# Altium PCB Counts_PCB.PcbDoc (part 1 of 2)
Units mil, origin at the board's own origin, x right, y up, seen from the top; angles counter-clockwise.
Board outline 3474.97 x 2159.98 mil, 2 copper layers (Top Layer, Bottom Layer); 162 components, 85 nets, 521 pads, 0 vias.
Unrouted connection lines stored in the file: 338.
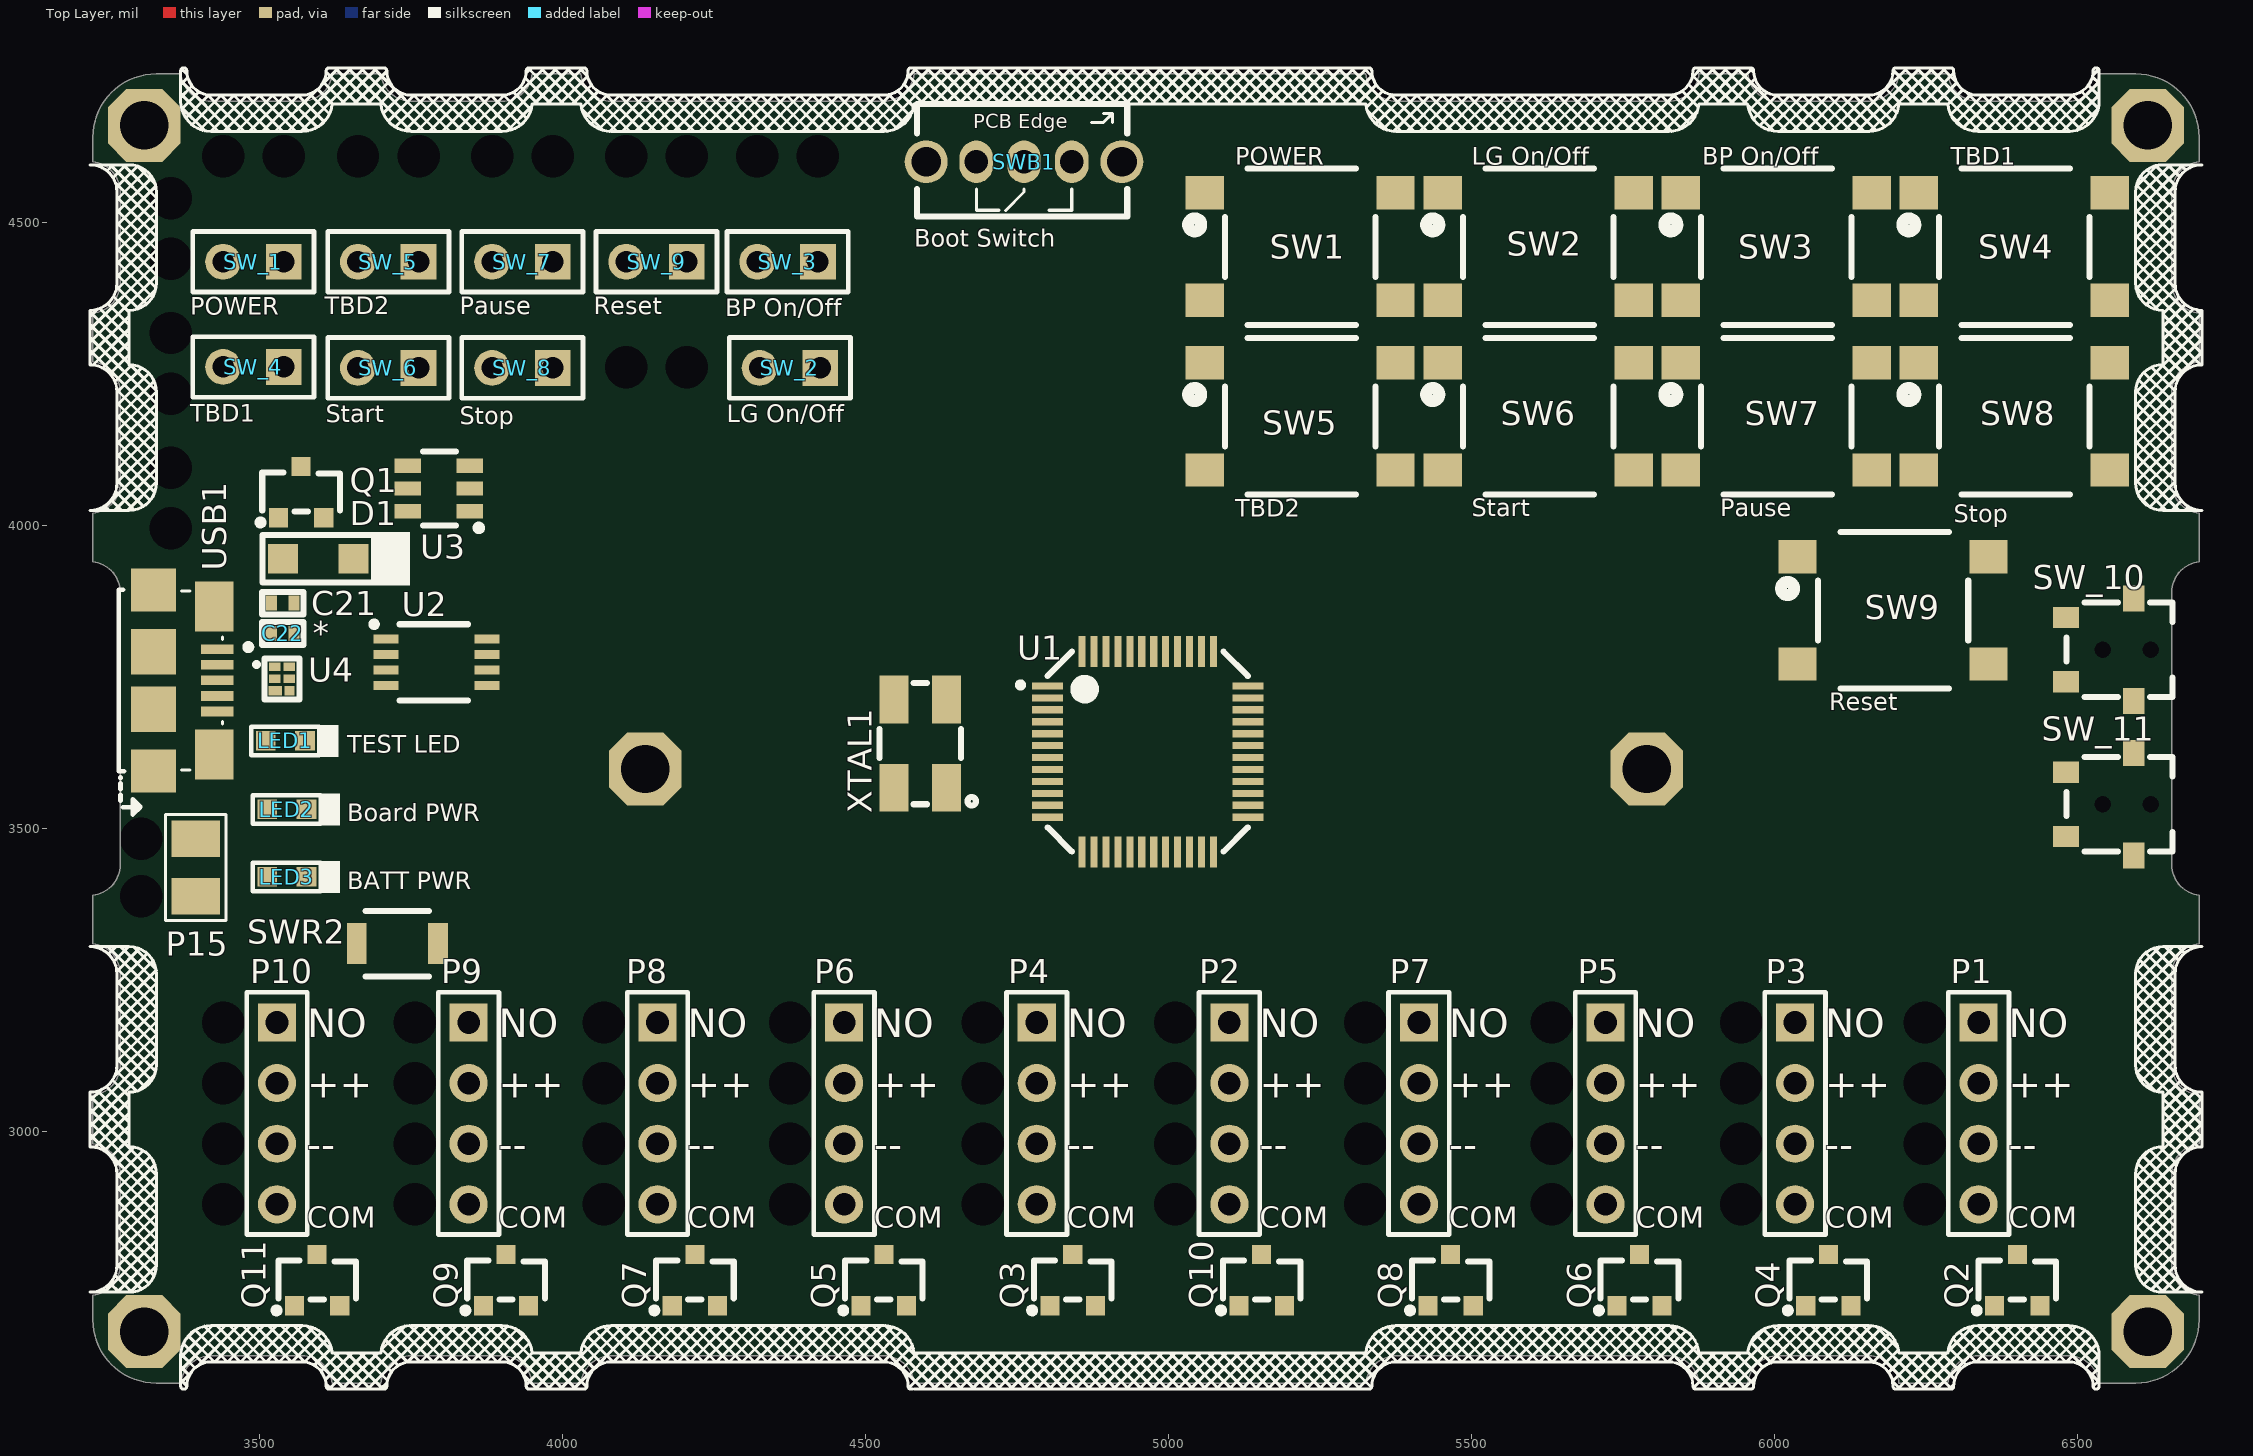
[diagram p0: Top Layer view]
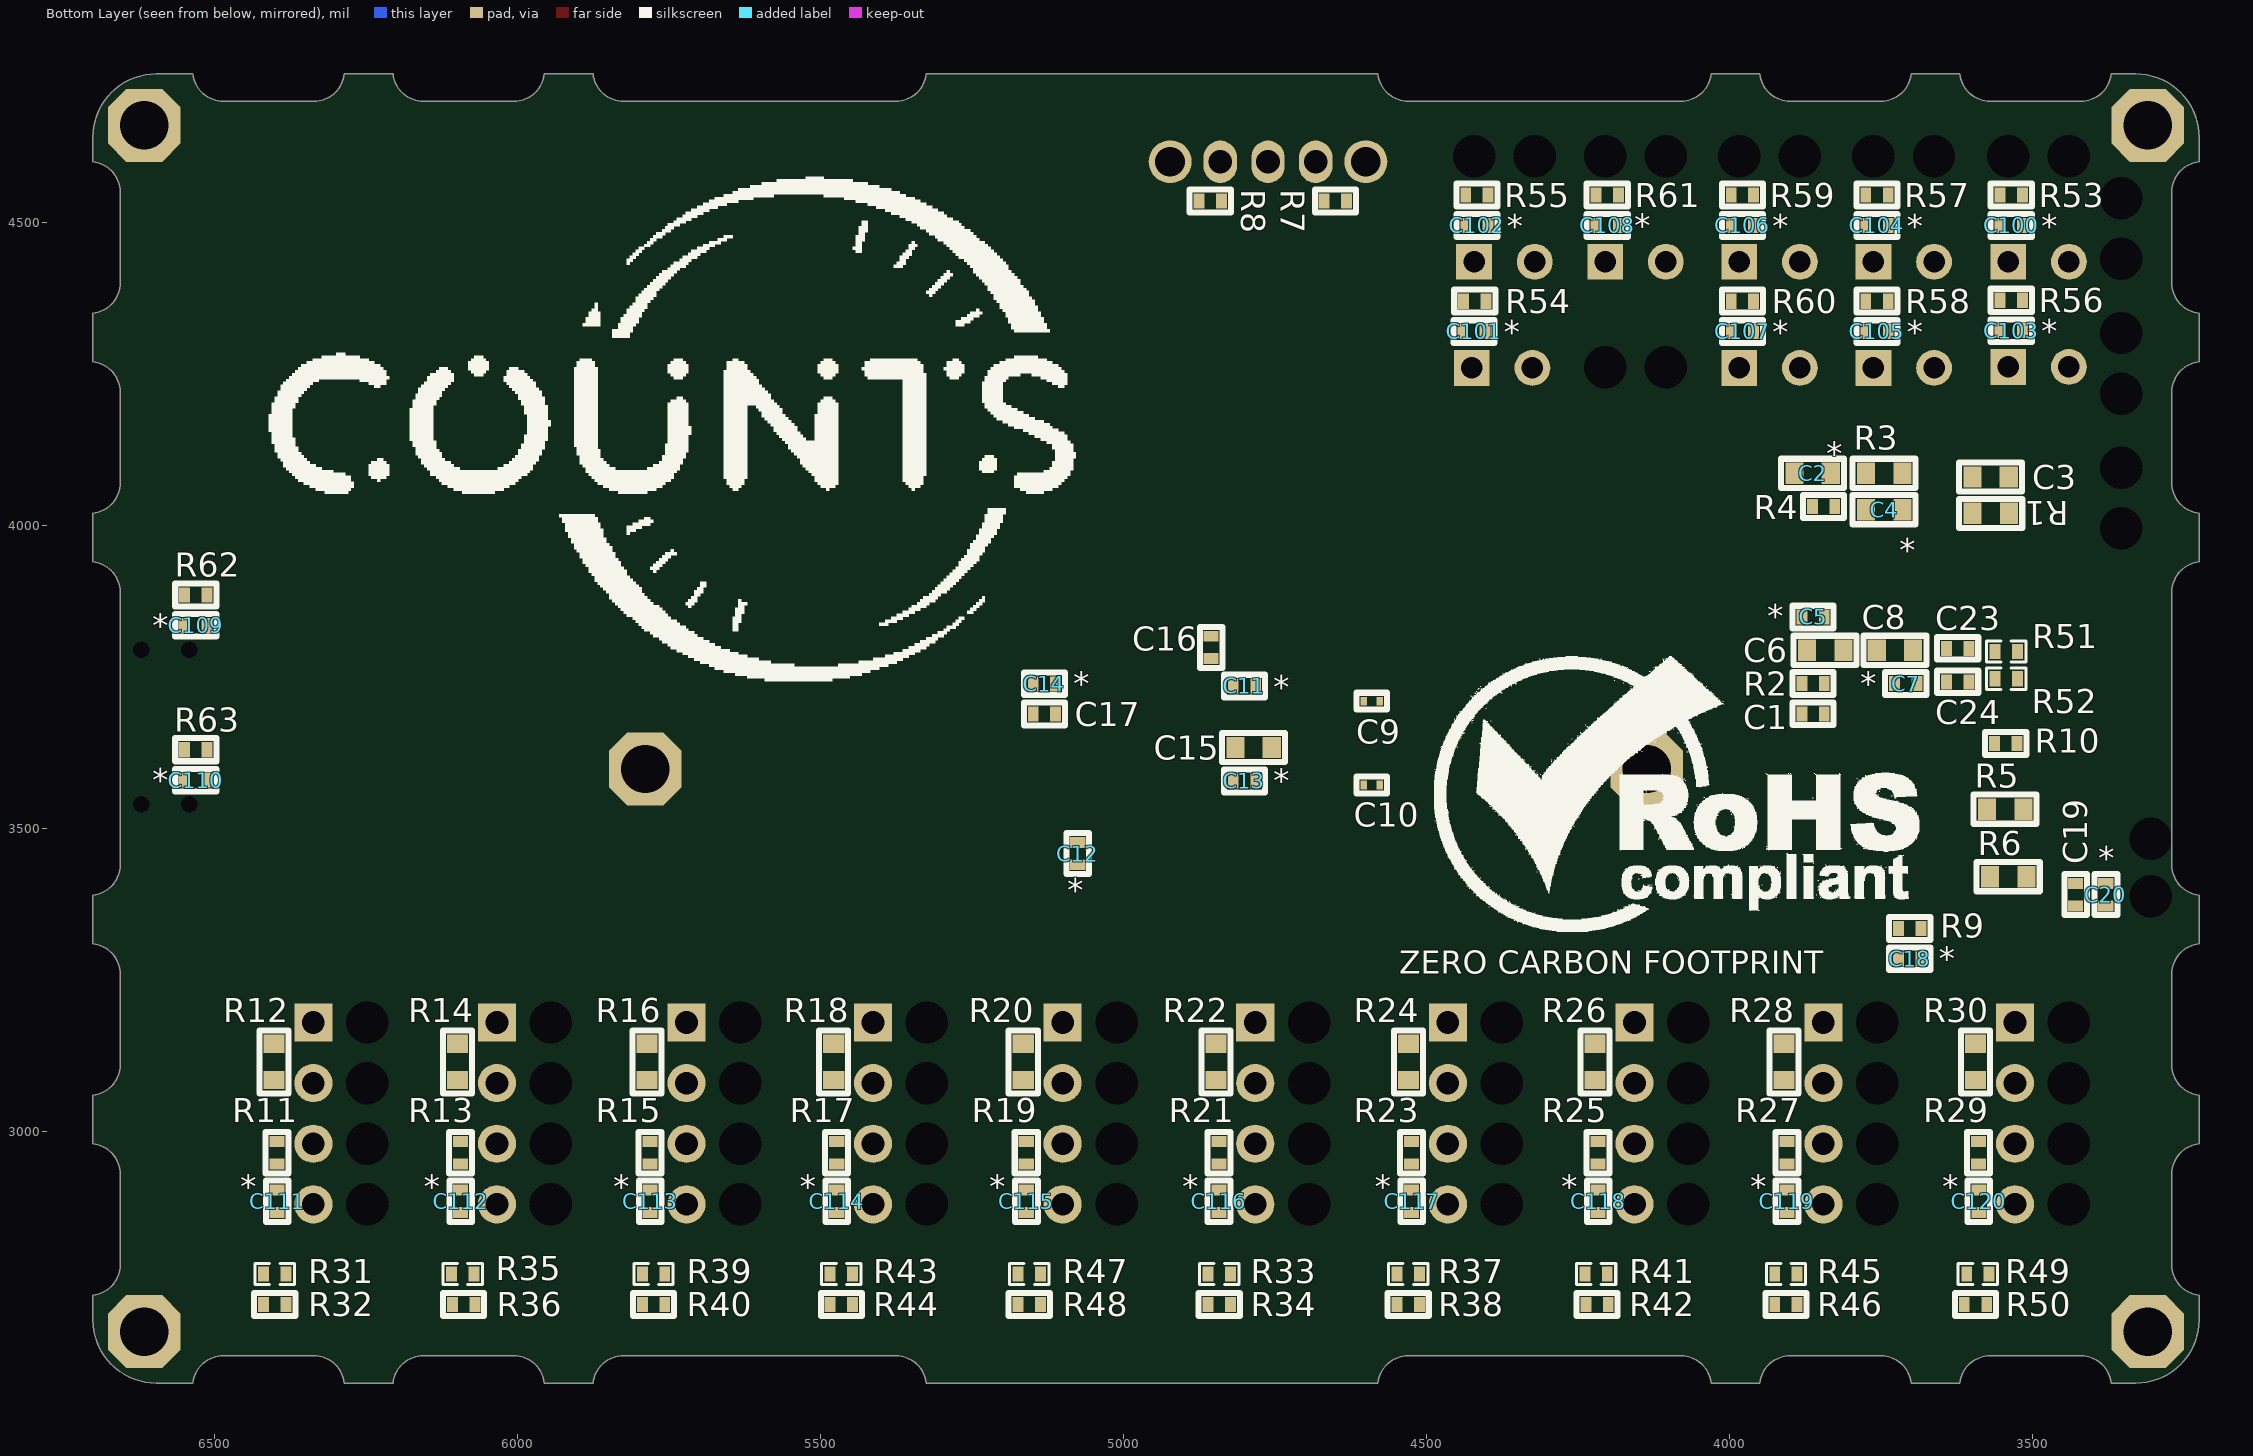
[diagram p1: Bottom Layer view, seen from below]

## Layer stack, top to bottom
Top Solder: solder mask 0.4, Solder Resist, Dk 3.5
Top Layer: signal copper 1.4
Dielectric 1: dielectric 12.6, FR-4, Dk 4.8
Bottom Layer: signal copper 1.4
Bottom Solder: solder mask 0.4, Solder Resist, Dk 3.5

## Board outline
3225.01,2689.69 cw(c3329.72,2689.72) 3225.01,2689.72 3225.01,2730.24 ccw(c3220,2780) 3270.01,2780 3270.01,2930 ccw(c3220,2930) 3225.01,2979.76 3225.01,3060.24 ccw(c3220,3110) 3270.02,3110 3270.02,3260 ccw(c3220,3260) 3225.02,3309.76 3225.02,3390.24 ccw(c3220,3440) 3270.02,3440 ccw(c3265,3440) 3270.02,3440.07 3270.02,3890 cw(c3265,3890) 3270.02,3889.91 3270.02,3890 ccw(c3220,3890) 3225.02,3939.76 3225.02,4020.24 ccw(c3220,4070) 3270.02,4070 3270.02,4220 ccw(c3220,4220) 3225.01,4269.76 3225.01,4350.24 ccw(c3220,4400) 3270.01,4400 3270.01,4550 ccw(c3220,4550) 3225.01,4599.76 3225.01,4640.28 cw(c3329.72,4640.28) 3225.01,4640.31 cw(c3329.72,4640.28) 3329.72,4744.99 ccw(c3329.72,4750) 3329.83,4744.99 3370.24,4744.99 ccw(c3420,4750) 3420,4699.99 3570,4699.99 ccw(c3570,4750) 3619.76,4744.99 3700.24,4744.99 ccw(c3750,4750) 3750,4699.99 3900,4699.99 ccw(c3900,4750) 3949.76,4744.99 4030.24,4744.99 ccw(c4080,4750) 4080,4699.99 ccw(c4080,4705) 4080.09,4699.99 4530,4699.99 ccw(c4530,4750) 4579.76,4744.99 ccw(c4580,4750) 4580,4744.99 4920,4744.99 ccw(c4920,4750) 4920.06,4744.99 5325.24,4744.99 ccw(c5375,4750) 5375,4699.99 ccw(c5375,4705) 5375.07,4699.99 5825,4699.99 ccw(c5825,4750) 5874.76,4744.99 5955.24,4744.99 ccw(c6005,4750) 6005,4699.99 6155,4699.99 ccw(c6155,4750) 6204.76,4744.99 6285.24,4744.99 ccw(c6335,4750) 6335,4699.99 6485,4699.99 ccw(c6485,4750) 6534.76,4744.99 6575.28,4744.99 ccw(c6575.28,4750) 6575.31,4744.99 6595.25,4744.99 ccw(c6595.28,4750) 6595.37,4744.99 ccw(c6595.28,4640.28) 6595.37,4744.99 ccw(c6595.28,4640.28) 6595.28,4744.99 6595.37,4744.99 cw(c6595.28,4640.28) 6699.99,4640.35 ccw(c6705,4640.28) 6699.99,4640.25 6699.99,4640.28 ccw(c6595.28,4640.28) 6699.99,4640.35 ccw(c6595.28,4640.28) 6699.99,4640.35 6699.99,4640.28 6699.99,4599.76 ccw(c6705,4550) 6654.99,4550 6654.99,4400 ccw(c6705,4400) 6699.99,4350.24 6699.99,4269.76 ccw(c6705,4220) 6654.99,4220 6654.99,4070 ccw(c6705,4070) 6699.99,4020.24 6699.99,3939.76 ccw(c6705,3890) 6654.98,3890 ccw(c6660,3890) 6654.99,3889.91 6654.99,3440 6654.98,3440 ccw(c6705,3440) 6699.98,3390.24 6699.98,3309.76 ccw(c6705,3260) 6654.99,3260 6654.99,3110 ccw(c6705,3110) 6699.99,3060.24 6699.99,2979.76 ccw(c6705,2930) 6654.99,2930 6654.99,2780 cw(c6660,2780) 6654.99,2780.08 6654.99,2780 ccw(c6705,2780) 6699.99,2730.24 6699.99,2689.72 cw(c6595.28,2689.72) 6699.99,2689.65 cw(c6595.28,2689.72) 6699.99,2689.65 cw(c6705,2689.72) 6699.99,2689.75 6699.99,2689.65 cw(c6595.28,2689.72) 6595.71,2585.01 6534.76,2585.01 ccw(c6485,2580) 6485,2630.01 6335,2630.01 ccw(c6335,2580) 6285.24,2585.01 6204.76,2585.01 ccw(c6155,2580) 6155,2630.01 6005,2630.01 ccw(c6005,2580) 5955.24,2585.01 5874.76,2585.01 ccw(c5825,2580) 5825,2630.01 ccw(c5825,2625) 5824.91,2630.01 5375,2630.01 cw(c5375,2625) 5375.07,2630.01 5375,2630.01 ccw(c5375,2580) 5325.24,2585.01 4920,2585.01 cw(c4920,2580) 4920.06,2585.01 4920,2585.01 4580,2585.01 ccw(c4580,2580) 4579.76,2585.01 ccw(c4530,2580) 4530,2630.01 ccw(c4530,2625) 4529.93,2630.01 4080,2630.01 cw(c4080,2625) 4080.09,2630.01 4080,2630.01 ccw(c4080,2580) 4030.24,2585.01 3949.76,2585.01 ccw(c3900,2580) 3900,2630.01 3750,2630.01 ccw(c3750,2580) 3700.24,2585.01 3619.76,2585.01 ccw(c3570,2580) 3570,2630.01 3420,2630.01 ccw(c3420,2580) 3370.24,2585.01 3329.72,2585.01 cw(c3329.72,2689.72)

## Design rules (kind name [scope] priority, off if disabled: settings)
Clearance [All] p1: gap=4 ignorepadtopadclearanceinfootprint=FALSE
MinimumSolderMaskSliver [All] p1: minsoldermaskwidth=0
PolygonConnect [All] p1: connectstyle=Relief reliefconductorwidth=10 reliefentries=4 polygonreliefangle="90 Angle" airgapwidth=10
RoutingVias [All] p1: holewidth=28 width=50 viastyle="Through Hole" minholewidth=28 minwidth=50 maxholewidth=28 maxwidth=50
SilkToSilkClearance [All] p1: silktosilkclearance=0
SilkToSolderMaskClearance [IsPad] p1: minsilkscreentomaskgap=0 clearancetoexposedcopper=TRUE
SolderMaskExpansion [All] p1: expansion=4
Width [All] p1: maxlimit=10 minlimit=10 preferedwidth=10
27 further rules are at their usual default settings.

## Classes and differential pairs
component class U_Power_Section: C1 C2 C3 C4 C5 C6 C7 C8 D1 LED2 LED3 Q1 R1 R2 R3 R4 R5 R6 U2 U3
component class U_Controller_Section: C9 C10 C11 C12 C13 C14 C15 C16 C17 C18 LED1 R7 R8 R9 R10 SWB1 SWR2 U1 XTAL1
component class U_Connector_Section: C19 C20 C21 C22 C23 C24 P15 R51 R52 U4 USB1
component class U_Buttons_Section: C111 C112 C113 C114 C115 C116 C117 C118 C119 C120 P1 P2 P3 P4 P5 P6 P7 P8 P9 P10 Q2 Q3 Q4 Q5 Q6 Q7 Q8 Q9 Q10 Q11 R11 R12 R13 R14 R15 R16 R17 R18 R19 R20 R21 R22 R23 R24 R25 R26 R27 R28 R29 R30 R31 R32 R33 R34 R35 R36 R37 R38 R39 R40 R41 R42 R43 R44 R45 R46 R47 R48 R49 R50
component class U_Buttons_Section_2: C100 C101 C102 C103 C104 C105 C106 C107 C108 C109 C110 R53 R54 R55 R56 R57 R58 R59 R60 R61 R62 R63 SW3 SW4 SW5 SW6 SW7 SW8 SW9 SW_1 SW_2 SW_3 SW_4 SW_5 SW_6 SW_7 SW_8 SW_9 SW_10 SW_11 SWB1 SWR2

## Components (designator, comment, footprint, x,y, rotation, side; value= is the part's Value field where it differs from the comment)
C1 "10nF" Cap0402 3862,3689 r0 bottom
C2 "0.1uF" Cap0603 3862.66,4086 r0 bottom
C3 "1uF" Cap0603 3569.06,4080 r180 bottom
C4 "0.1uF" Cap0603 3744.66,4026 r180 bottom
C5 "0.1uF" Cap0402 3862,3849 r180 bottom
C6 "1uF" Cap0603 3842,3794 r0 bottom
C7 "0.1uF" Cap0402 3709,3739 r0 bottom
C8 "1uF" Cap0603 3727,3794 r180 bottom
C9 "20pF" "Cap 0201" 4590,3710 r0 bottom
C10 "20pF" "Cap 0201" 4590,3572 r180 bottom
C11 "0.1uF" Cap0402 4800,3735.2 r180 bottom
C12 "0.1uF" Cap0402 5075,3458.66 r270 bottom
C13 "0.1uF" Cap0402 4800,3578.66 r180 bottom
C14 "0.1uF" Cap0402 5130,3738.66 r0 bottom
C15 "4.7uF" Cap0603 4785,3633.66 r0 bottom
C16 "1uF" Cap0402 4855,3798.66 r90 bottom
C17 "10nF" Cap0402 5130,3688.66 r0 bottom
C18 "0.1uF" Cap0402 3702.5,3285 r0 bottom
C19 "10uF" Cap0402 3429,3391 r90 bottom
C20 "0.1uF" Cap0402 3379,3391 r90 bottom
C21 "10uF" Cap0402 3538.5,3872.01 r0 top
C22 "0.1uF" Cap0402 3538.5,3822.01 r0 top
C23 "47pF" Cap0402 3623.5,3797.01 r0 bottom
C24 "47pF" Cap0402 3623.5,3742.01 r0 bottom
C100 "0.1uF" Cap0402 3535,4495 r180 bottom
C101 "0.1uF" Cap0402 4421.5,4320 r180 bottom
C102 "0.1uF" Cap0402 4416.5,4495 r180 bottom
C103 "0.1uF" Cap0402 3535,4321.5 r180 bottom
C104 "0.1uF" Cap0402 3756.5,4495 r180 bottom
C105 "0.1uF" Cap0402 3756.5,4320 r180 bottom
C106 "0.1uF" Cap0402 3978.5,4495 r180 bottom
C107 "0.1uF" Cap0402 3978.5,4320 r180 bottom
C108 "0.1uF" Cap0402 4201.5,4495 r180 bottom
C109 "0.1uF" Cap0402 6530,3835 r0 bottom
C110 "0.1uF" Cap0402 6530,3580 r180 bottom
C111 "0.1uF" Cap0402 6396.11,2885 r90 bottom
C112 "0.1uF" Cap0402 6093.33,2885 r90 bottom
C113 "0.1uF" Cap0402 5780.56,2885 r90 bottom
C114 "0.1uF" Cap0402 5472.78,2885 r90 bottom
C115 "0.1uF" Cap0402 5160,2885 r90 bottom
C116 "0.1uF" Cap0402 4842.22,2885 r90 bottom
C117 "0.1uF" Cap0402 4524.44,2885 r90 bottom
C118 "0.1uF" Cap0402 4216.67,2885 r90 bottom
C119 "0.1uF" Cap0402 3905,2885 r90 bottom
C120 "0.1uF" Cap0402 3588.39,2885 r270 bottom
D1 "MBR120VLSFT3G" MBR120VLSFT3G 3596.96,3945 r0 top
LED1 "LTST-C191KGKT" "LED 0603" 3542.52,3645 r0 top
LED2 "Blue" "LED 0603" 3545,3531.85 r0 top
LED3 "Blue" "LED 0603" 3545,3420.5 r0 top
P1 "61300411121" HDR1X4 6336.11,3030 r0 top
P2 "61300411121" HDR1X4 5100,3030 r0 top
P3 "61300411121" HDR1X4 6033.33,3030 r0 top
P4 "61300411121" HDR1X4 4782.22,3030 r0 top
P5 "61300411121" HDR1X4 5720.56,3030 r0 top
P6 "61300411121" HDR1X4 4464.44,3030 r0 top
P7 "61300411121" HDR1X4 5412.78,3030 r0 top
P8 "61300411121" HDR1X4 4156.67,3030 r0 top
P9 "61300411121" HDR1X4 3845,3030 r0 top
P10 "61300411121" HDR1X4 3528.89,3030 r0 top
P15 "SMD PAD" "Solder Bridge" 3394.79,3438.01 r90 top
Q1 "DMP2045U-7" SOT23-3 3568.53,4055 r0 top locked
Q2 "MMBT918LT1G" SOT23-3 6400.01,2755 r0 top locked
Q3 "MMBT918LT1G" SOT23-3 4841.67,2755 r0 top locked
Q4 "MMBT918LT1G" SOT23-3 6088.34,2755 r0 top locked
Q5 "MMBT918LT1G" SOT23-3 4530,2755 r0 top locked
Q6 "MMBT918LT1G" SOT23-3 5776.67,2755 r0 top locked
Q7 "MMBT918LT1G" SOT23-3 4218.33,2755 r0 top locked
Q8 "MMBT918LT1G" SOT23-3 5465,2755 r0 top locked
Q9 "MMBT918LT1G" SOT23-3 3906.67,2755 r0 top locked
Q10 "MMBT918LT1G" SOT23-3 5153.34,2755 r0 top locked
Q11 "MMBT918LT1G" SOT23-3 3595,2755 r0 top locked
R1 "100K" Res0603 3568.89,4020 r0 bottom
R2 "10K" Res0402 3862,3739 r180 bottom
R3 "665R" Res0603 3744.66,4086 r0 bottom
R4 "10K" Res0402 3844.66,4031 r0 bottom
R5 "330R" Res0603 3545,3531.85 r180 bottom
R6 "330R" Res0603 3540,3420.5 r180 bottom
R7 "20K" Res0402 4650,4535 r180 bottom
R8 "20K" Res0402 4856.5,4535 r0 bottom
R9 "20K" Res0402 3702.5,3335 r180 bottom
R10 "1K" Res0402 3544.01,3640 r0 bottom
R11 "10K" Res0402 6396.11,2965 r90 bottom
R12 "330R" Res0603 6401.11,3115 r90 bottom
R13 "10K" Res0402 6093.33,2965 r90 bottom
R14 "330R" Res0603 6098.33,3115 r90 bottom
R15 "10K" Res0402 5780.56,2965 r90 bottom
R16 "330R" Res0603 5785.56,3115 r90 bottom
R17 "10K" Res0402 5472.78,2965 r90 bottom
R18 "330R" Res0603 5477.78,3115 r90 bottom
R19 "10K" Res0402 5160,2965 r90 bottom
R20 "330R" Res0603 5165,3115 r270 bottom
R21 "10K" Res0402 4842.22,2965 r90 bottom
R22 "330R" Res0603 4847.22,3115 r90 bottom
R23 "10K" Res0402 4524.44,2965 r90 bottom
R24 "330R" Res0603 4529.44,3115 r90 bottom
R25 "10K" Res0402 4216.67,2965 r90 bottom
R26 "330R" Res0603 4221.67,3115 r90 bottom
R27 "10K" Res0402 3905,2965 r90 bottom
R28 "330R" Res0603 3910,3115 r270 bottom
R29 "10K" Res0402 3588.89,2965 r90 bottom
R30 "330R" Res0603 3593.89,3115 r90 bottom
R31 "4.7K" Res0402 6400,2765 r180 bottom
R32 "47K" Res0402 6400,2715 r180 bottom
R33 "4.7K" Res0402 4841.66,2765 r180 bottom
R34 "47K" Res0402 4841.66,2715 r180 bottom
R35 "4.7K" Res0402 6090,2765 r180 bottom
R36 "47K" Res0402 6088.33,2715 r180 bottom
R37 "4.7K" Res0402 4530,2765 r180 bottom
R38 "47K" Res0402 4530,2715 r180 bottom
R39 "4.7K" Res0402 5775,2765 r180 bottom
R40 "47K" Res0402 5775,2715 r180 bottom
R41 "4.7K" Res0402 4220,2765 r180 bottom
R42 "47K" Res0402 4218.33,2715 r180 bottom
R43 "4.7K" Res0402 5465,2765 r180 bottom
R44 "47K" Res0402 5465,2715 r180 bottom
R45 "4.7K" Res0402 3906.66,2765 r180 bottom
R46 "47K" Res0402 3906.66,2715 r180 bottom
R47 "4.7K" Res0402 5155,2765 r180 bottom
R48 "47K" Res0402 5155,2715 r180 bottom
R49 "4.7K" Res0402 3590,2765 r180 bottom
R50 "47K" Res0402 3594,2715 r180 bottom
R51 "27R" Res0402 3543.5,3792.01 r180 bottom
R52 "27R" Res0402 3543.5,3747.01 r180 bottom
R53 "10K" Res0402 3535,4545 r180 bottom
R54 "10K" Res0402 4420,4370 r180 bottom
R55 "10K" Res0402 4416.5,4545 r180 bottom
R56 "10K" Res0402 3535,4371.5 r180 bottom
R57 "10K" Res0402 3756.5,4545 r180 bottom
R58 "10K" Res0402 3756.5,4370 r180 bottom
R59 "10K" Res0402 3978.5,4545 r180 bottom
R60 "10K" Res0402 3978.5,4370 r180 bottom
R61 "10K" Res0402 4201.5,4545 r180 bottom
R62 "10K" Res0402 6530,3885 r0 bottom
R63 "10K" Res0402 6530,3630 r180 bottom
SW1 "B3FS-1012P" B3FS-1012P 5216.85,4460 r180 top
SW2 "B3FS-1012P" B3FS-1012P 5609.57,4460 r180 top
SW3 "B3FS-1012P" B3FS-1012P 6002.28,4460 r180 top
SW4 "B3FS-1012P" B3FS-1012P 6395,4460 r180 top
SW5 "B3FS-1012P" B3FS-1012P 5216.85,4180 r180 top
SW6 "B3FS-1012P" B3FS-1012P 5609.57,4180 r180 top
SW7 "B3FS-1012P" B3FS-1012P 6002.28,4180 r180 top
SW8 "B3FS-1012P" B3FS-1012P 6395,4180 r180 top
SW9 "B3FS-1012P" B3FS-1012P 6195,3860 r180 top
SW_1 "61300211121" HDR1X2 3539.94,4435 r180 top
SW_2 "61300211121" HDR1X2 4424.94,4260 r180 top
SW_3 "61300211121" HDR1X2 4421.19,4435 r180 top
SW_4 "61300211121" HDR1X2 3539.94,4261.5 r180 top
SW_5 "61300211121" HDR1X2 3762.44,4435 r180 top
SW_6 "61300211121" HDR1X2 3762.44,4260 r180 top
SW_7 "61300211121" HDR1X2 3983.69,4435 r180 top
SW_8 "61300211121" HDR1X2 3983.69,4260 r180 top
SW_9 "61300211121" HDR1X2 4204.94,4435 r180 top
SW_10 "ESE-18R61D" ESE-18R61D 6550.12,3795 r270 top locked
SW_11 "ESE-18R61D" ESE-18R61D 6550.12,3540 r270 top locked
SWB1 "OS102011MA1QN1" OS102011MA1QN1 4682.52,4600 r0 top
SWR2 "B3U-1000P" B3U-1000P 3727.5,3310 r0 top
U1 "STM32F070CBT6TR" STM32F070CBT6TR 4965.35,3626.93 r0 top locked
U2 "NCP3335ADM330R2G" NCP3335ADM330R2G 3792,3774 r0 top locked
U3 "BQ21040DBVR" BQ21040DBVR 3795.84,4061 r180 top locked
U4 "SP3014-02UTG" SP3014-02UTG 3525,3766.69 r0 top
USB1 "10118192-0001LF" "Micro Usb Conn SMD" 3377.66,3744.25 r90 top locked
XTAL1 "8MHZ" 7B08070001 4590,3640 r90 top locked

## Footprints (in the part's own frame and the unit in brackets; to place one, negate y for a bottom-side part, rotate by r counter-clockwise, add the part's x,y. Pads: shape width x height; smd on the part's side, far side on the other; paste and mask are expansions set on the pad)
7B08070001 [mm]
  rect 2x1.2 smd: 1(-1.85,-1.1) 2(1.85,-1.1) 3(1.85,1.1) 4(-1.85,1.1)
  silkscreen extent -2.59,-2.34 2.54,1.7, body extent -2.47,-1.6 2.53,1.6, height 0.91
B3FS-1012P [mm]
  rect 1.6x1.4 smd: 1(4,-2.25) 2(-4,-2.25) 3(4,2.25) 4(-4,2.25)
  silkscreen extent -3.15,-3.28 4.69,3.28, body extent -4,-3.15 4,3.15, height 3.1
B3U-1000P [mm] "SWITCH TACTILE SPST-NO 0.05A 12V"
  rect 0.82x1.72 smd: 1(-1.7,0) 2(1.7,0)
  silkscreen extent -1.35,-1.37 1.32,1.37, body extent -2,-1.26 2,1.24, height 1.6
BQ21040DBVR [mm]
  rect 1.1x0.6 smd: 1(-1.3,0.95) 2(-1.3,0) 3(-1.3,-0.95) 4(1.3,-0.95) 5(1.3,0) 6(1.3,0.95)
  silkscreen extent -1.81,-1.55 0.66,1.79, body extent -1.4,-1.45 1.4,1.45, height 1.37
Cap0402 [mil]
  rect 18x25 smd: 1(-18.5,0) 2(18.5,0)
  silkscreen extent -34,-19 34,18, body extent -20,-10 20,10, height 19
Cap0603 [mil]
  rect 30x35 smd: 1(30,0) 2(-30,0)
  silkscreen extent -52,-24 52,24, body extent -31,-16 32,16, height 34
"Cap 0201" [mm]
  rect 0.27x0.37 smd: 1(-0.33,0) 2(0.33,0)
  silkscreen extent -0.64,-0.36 0.64,0.36, body extent -0.3,-0.16 0.3,0.17, height 0.21
ESE-18R61D [mm]
  rect 1.1x0.9 smd: 1(-2.15,1.075) 2(2.15,1.075)
  round 0 hole 0.7 unplated: MH1(0,1.775) MH1(0,-0.235)
  rect 0.9x1.1 smd: MP1(-1.35,-1.775) MP2(1.35,-1.775)
  silkscreen extent -1.98,-1.75 1.98,2.69, body extent -2.49,-2.13 2.51,4.68, height 1.23
HDR1X2 [mm] "CONN HEADER VERT 2POS 2.54MM"
  rect 1.5x1.5 hole 0.9: 1(0,0)
  round 1.5 hole 0.9: 2(2.54,0)
  silkscreen extent -1.27,-1.27 3.81,1.27, body extent -1.27,-1.27 3.81,1.27, height 8.44
HDR1X4 [mm] "Connector; Header; 4 Position"
  rect 1.6x1.6 hole 0.95: 1(0,3.81)
  round 1.6 hole 0.95: 2(0,1.27) 3(0,-1.27) 4(0,-3.81)
  silkscreen extent -1.27,-5.08 1.27,5.08, body extent -1.27,-5.08 1.27,5.08, height 9.5
"LED 0603" [mm]
  rect 0.82x0.82 smd: 1(-0.825,0) 2(0.825,0)
  silkscreen extent -1.42,-0.69 2.24,0.66, body extent -0.8,-0.4 0.8,0.4, height 0.38
MBR120VLSFT3G [mm] "DIODE SCHOTTKY 20V 1A SOD123FL"
  rect 1.25x1.22 smd: 1(-1.475,0) 2(1.475,0)
  silkscreen extent -2.33,-1.12 3.84,1.12, body extent -1.87,-0.85 1.88,0.85, height 1.2
"Micro Usb Conn SMD" [mm] "CONN RCPT USB2.0 MICRO B SMD R/A"
  rect 0.4x1.35 smd: 1(1.3,-1.338) 2(0.65,-1.338) 3(0,-1.338) 4(-0.65,-1.338) 5(-1.3,-1.338)
  rect 2.1x1.6 smd: MP1(3.1,-1.212) MP2(-3.1,-1.212)
  rect 1.8x1.9 smd: MP3(-3.8,1.338) MP6(3.8,1.338)
  rect 1.9x1.9 smd: MP4(-1.2,1.338) MP5(1.2,1.338)
  silkscreen extent -5.61,-2.74 3.8,2.79, body extent -3.95,-1.57 3.96,4.09, height 2.74
NCP3335ADM330R2G [mm]
  rect 1.04x0.38 smd: 1(-2.12,0.975) 2(-2.12,0.325) 3(-2.12,-0.325) 4(-2.12,-0.975) 5(2.12,-0.975) 6(2.12,-0.325) 7(2.12,0.325) 8(2.12,0.975)
  silkscreen extent -2.73,-1.6 1.32,1.71, body extent -2.46,-1.53 2.46,1.52, height 1.01
OS102011MA1QN1 [mm] "2 Position SPDT Miniature Slide Switch 100MA 12V Through Hole, Right Angle"
  oval 1.4x1.778 hole 1: 1(0,0) 2(2,0) 3(4,0)
  round 1.8 hole 1.25: MH1(-2.1,0) MH2(6.1,0)
  silkscreen extent -2.49,-2.29 6.32,2.41, body extent -2.4,-2.29 6.21,6.09, height 4.71
Res0402 [mil]
  rect 18x25 smd: 1(-18.5,0) 2(18.5,0)
  silkscreen extent -34,-19 34,19, body extent -23,-11 23,11, height 16
Res0603 [mil]
  rect 30x35 smd: 1(30,0) 2(-30,0)
  silkscreen extent -52,-24 52,24, body extent -31,-17 31,17, height 18
"Solder Bridge" [mil] "Solder Bridge ON"
  rect 60x80 smd: 1(-50,0) 2(45,0)
  silkscreen extent -90,-50 85,50
SOT23-3 [mm] "SOT23, 3-Leads, Body 2.9x1.3mm, Pitch 0.95mm, Lead Span 2.3mm - Reverse Pinning, IPC High Density"
  rect 0.8x0.8 smd: 1(-0.95,-1.075) 2(0.95,-1.075) 3(0,1.075)
  silkscreen extent -1.83,-1.39 1.63,0.81, body extent -1.5,-1.25 1.5,1.25, height 1.05
SP3014-02UTG [mm]
  rect 0.48x0.35 smd: 1(0,0) 2(0,-0.5) 5(0.62,-0.5) 6(0.62,0)
  rect 0.55x0.4 smd: 3(0.025,-1)
  rect 0.42x0.4 smd: 4(0.62,-1)
  silkscreen extent -0.82,-1.37 1.04,0.36
STM32F070CBT6TR [mm]
  rect 1.3x0.3 smd: 1(-4.2,2.75) 2(-4.2,2.25) 3(-4.2,1.75) 4(-4.2,1.25) 5(-4.2,0.75) 6(-4.2,0.25) 7(-4.2,-0.25) 8(-4.2,-0.75) 9(-4.2,-1.25) 10(-4.2,-1.75) 11(-4.2,-2.25) 12(-4.2,-2.75) 25(4.2,-2.75) 26(4.2,-2.25) 27(4.2,-1.75) 28(4.2,-1.25) 29(4.2,-0.75) 30(4.2,-0.25) 31(4.2,0.25) 32(4.2,0.75) 33(4.2,1.25) 34(4.2,1.75) 35(4.2,2.25) 36(4.2,2.75)
  rect 0.3x1.3 smd: 13(-2.75,-4.2) 14(-2.25,-4.2) 15(-1.75,-4.2) 16(-1.25,-4.2) 17(-0.75,-4.2) 18(-0.25,-4.2) 19(0.25,-4.2) 20(0.75,-4.2) 21(1.25,-4.2) 22(1.75,-4.2) 23(2.25,-4.2) 24(2.75,-4.2) 37(2.75,4.2) 38(2.25,4.2) 39(1.75,4.2) 40(1.25,4.2) 41(0.75,4.2) 42(0.25,4.2) 43(-0.25,4.2) 44(-0.75,4.2) 45(-1.25,4.2) 46(-1.75,4.2) 47(-2.25,4.2) 48(-2.75,4.2)
  silkscreen extent -5.44,-4.19 4.19,4.19, body extent -4.5,-4.5 4.5,4.5, height 1.39

## Part data
C1 C17: library part CC0402KRX7R8BB103, "CAP CER 10000PF 25V X7R 0402", Case/Package=0402, Case Code (Metric)=1005, Dielectric=X7R, Manufacturer=Yageo, Max Operating Temperature=125°C, Min Operating Temperature=-55°C, Package Quantity=1, Supplier Part Number 1=311-1337-1-ND, Tolerance=10%, Voltage Rating=25V, Capacitance=10nF, Case Code (Imperial)=0402, ComponentLink1Description=http://www.yageo.com/documents/recent/UPY-GPHC_X7R_6.3V-to-50V_18.pdf?src-supplier=Digi-Key, ComponentLink1URL=http://www.yageo.com/documents/recent/UPY-GPHC_X7R_6.3V-to-50V_18.pdf?src-supplier=Digi-Key, ComponentLink2Description=https://www.verical.com/server-webapp/html/getDatasheet?partID=375418&src-supplier=Verical, ComponentLink2URL=https://www.verical.com/server-webapp/html/getDatasheet?partID=375418&src-supplier=Verical, ComponentLink3Description=http://www.yageo.com/documents/recent/UPY-GPHC_X7R_6.3V-to-50V_8.pdf?src-supplier=Avnet, ComponentLink3URL=http://www.yageo.com/documents/recent/UPY-GPHC_X7R_6.3V-to-50V_8.pdf?src-supplier=Avnet, ComponentLink4Description=https://4donline.ihs.com/images/VipMasterIC/IC/YAGO/YAGO-S-A0003557223/YAGO-S-A0003557223-1.pdf?hkey=52A5661711E402568146F3353EA87419&src-supplier=Element14, ComponentLink4URL=https://4donline.ihs.com/images/VipMasterIC/IC/YAGO/YAGO-S-A0003557223/YAGO-S-A0003557223-1.pdf?hkey=52A5661711E402568146F3353EA87419&src-supplier=Element14, ComponentLink5Description=http://www.farnell.com/datasheets/2167236.pdf?src-supplier=Element14, ComponentLink5URL=http://www.farnell.com/datasheets/2167236.pdf?src-supplier=Element14, ComponentLink6Description=http://www.mouser.com/ds/2/447/Yageo_UPY-GP_NP0_16V-to-50V_9-358835.pdf?src-supplier=Mouser, ComponentLink6URL=http://www.mouser.com/ds/2/447/Yageo_UPY-GP_NP0_16V-to-50V_9-358835.pdf?src-supplier=Mouser, Composition=Ceramic, Depth=0.5mm, Halogen Free="Halogen Free", Height=0.5mm, Lead Free="Lead Free", Length=1mm, Manufacturer Part Number=CC0402KRX7R8BB103, Mount="Surface Mount", Packaging="Tape and Reel", Pricing 1="1=0.1, 10=0.021, 100=0.0093, 500=0.00666, 1000=0.00523, 2500=0.00476, 5000=0.00438 (USD)", Radiation Hardening=No, REACH SVHC=Unknown, Stock 1=0, Supplier 1=Digi-Key, Termination=SMD/SMT, Thickness=0.022inch, Voltage Rating (DC)=25V, Width=0.02inch
C2 C4: library part CC0603ZRY5V9BB104, "CAP CER 0.1UF 50V Y5V 0603", Capacitance=100nF, Case/Package=0603, Case Code (Metric)=1608, Dielectric=Y5V, Manufacturer=Yageo, Max Operating Temperature=85°C, Min Operating Temperature=-30°C, Package Quantity=1, Supplier Part Number 1=311-1343-1-ND, Tolerance=80%, Voltage=50V, Case Code (Imperial)=0603, ComponentLink1Description=http://www.yageo.com/documents/recent/UPY-GPHC_Y5V_6.3V-to-50V_8.pdf?src-supplier=Digi-Key, ComponentLink1URL=http://www.yageo.com/documents/recent/UPY-GPHC_Y5V_6.3V-to-50V_8.pdf?src-supplier=Digi-Key, ComponentLink2Description=http://www.yageo.com/documents/recent/UPY-GPHC_Y5V_6.3V-to-50V_5.pdf?src-supplier=Avnet+Europe, ComponentLink2URL=http://www.yageo.com/documents/recent/UPY-GPHC_Y5V_6.3V-to-50V_5.pdf?src-supplier=Avnet+Europe, ComponentLink3Description=https://www.verical.com/server-webapp/html/getDatasheet?partID=403611&src-supplier=Verical, ComponentLink3URL=https://www.verical.com/server-webapp/html/getDatasheet?partID=403611&src-supplier=Verical, ComponentLink4Description=http://www.mouser.com/ds/2/447/Yageo_UPY-GP_NP0_16V-to-50V_9-358835.pdf?src-supplier=Mouser, ComponentLink4URL=http://www.mouser.com/ds/2/447/Yageo_UPY-GP_NP0_16V-to-50V_9-358835.pdf?src-supplier=Mouser, ComponentLink5Description=http://www.farnell.com/datasheets/1132289.pdf?src-supplier=Element14, ComponentLink5URL=http://www.farnell.com/datasheets/1132289.pdf?src-supplier=Element14, Composition=Ceramic, Depth=0.8mm, Halogen Free="Halogen Free", Height=0.8mm, Lead Free="Lead Free", Length=1.6mm, Manufacturer Part Number=CC0603ZRY5V9BB104, Mount="Surface Mount", Number of Pins=2, Packaging="Tape and Reel", Pricing 1="1=0.1, 10=0.075, 100=0.0334, 500=0.02386, 1000=0.01874 (USD)", Radiation Hardening=No, REACH SVHC="No SVHC", Stock 1=15000880, Supplier 1=Digi-Key, Termination=SMD/SMT, Thickness=0.035inch, Voltage Rating=50V, Voltage Rating (DC)=50V, Width=0.031inch
C3 C6 C8: library part UMK107AB7105KA-T, "CAP CER 1UF 50V X7R 0603", Case/Package=0603, Case Code (Metric)=1608, Dielectric=X7R, Manufacturer="Taiyo Yuden", Max Operating Temperature=125°C, Min Operating Temperature=-55°C, Package Quantity=1, Supplier Part Number 1=587-3247-1-ND, Tolerance=10%, Voltage Rating=50V, Capacitance=1uF, Case Code (Imperial)=0603, ComponentLink1Description=http://www.farnell.com/datasheets/2048165.pdf?src-supplier=Element14, ComponentLink1URL=http://www.farnell.com/datasheets/2048165.pdf?src-supplier=Element14, ComponentLink2Description=https://www.murata.com/~/media/webrenewal/support/library/catalog/products/capacitor/mlcc/c02e.ashx?la=en-us&src-supplier=Digi-Key, ComponentLink2URL=https://www.murata.com/~/media/webrenewal/support/library/catalog/products/capacitor/mlcc/c02e.ashx?la=en-us&src-supplier=Digi-Key, ComponentLink3Description=https://www.yuden.co.jp/productdata/catalog/mlcc_all_e.pdf?src-supplier=Digi-Key, ComponentLink3URL=https://www.yuden.co.jp/productdata/catalog/mlcc_all_e.pdf?src-supplier=Digi-Key, ComponentLink4Description=https://www.yuden.co.jp/productdata/catalog/mlcc_all_e.pdf?src-supplier=Onlinecomponents.com, ComponentLink4URL=https://www.yuden.co.jp/productdata/catalog/mlcc_all_e.pdf?src-supplier=Onlinecomponents.com, Depth=0.8mm, Halogen Free="Halogen Free", Height=0.8mm, Length=1.6mm, Manufacturer Part Number=UMK107AB7105KA-T, Mount="Surface Mount", Packaging="Tape and Reel", Pricing 1="1=0.28, 10=0.19, 100=0.1079, 500=0.0762, 1000=0.0667 (USD)", Radiation Hardening=No, Stock 1=453098, Supplier 1=Digi-Key, Termination=SMD/SMT, Thickness=0.037inch, Voltage Rating (DC)=50V, Width=0.031inch
C5 C7 C11 C12 C13 C14 C18 C20 C22 C100 C101 C102 C103 C104 C105 C106 C107 C108 C109 C110 C111 C112 C113 C114 C115 C116 C117 C118 C119 C120: library part CC0402KRX7R7BB104, "CAP CER 0.1UF 16V X7R 0402", Capacitance=100nF, Case/Package=0402, Case Code (Metric)=1005, Dielectric=X7R, Manufacturer=Yageo, Max Operating Temperature=125°C, Min Operating Temperature=-55°C, Package Quantity=1, Supplier Part Number 1=311-1338-1-ND, Tolerance=10%, Voltage=16V, Case Code (Imperial)=0402, ComponentLink1Description=http://www.yageo.com/documents/recent/UPY-GPHC_X7R_6.3V-to-50V_8.pdf?src-supplier=Avnet+Europe, ComponentLink1URL=http://www.yageo.com/documents/recent/UPY-GPHC_X7R_6.3V-to-50V_8.pdf?src-supplier=Avnet+Europe, ComponentLink2Description=http://www.yageo.com/documents/recent/UPY-GPHC_X7R_6.3V-to-50V_18.pdf?src-supplier=Digi-Key, ComponentLink2URL=http://www.yageo.com/documents/recent/UPY-GPHC_X7R_6.3V-to-50V_18.pdf?src-supplier=Digi-Key, ComponentLink3Description=http://www.yageo.com/documents/recent/UPY-GPHC_X7R_6.3V-to-50V_8.pdf?src-supplier=Avnet, ComponentLink3URL=http://www.yageo.com/documents/recent/UPY-GPHC_X7R_6.3V-to-50V_8.pdf?src-supplier=Avnet, ComponentLink4Description=http://www.yageo.com/documents/recent/UPY-GPHC_X7R_6.3V-to-50V_18.pdf?src-supplier=Mouser, ComponentLink4URL=http://www.yageo.com/documents/recent/UPY-GPHC_X7R_6.3V-to-50V_18.pdf?src-supplier=Mouser, ComponentLink5Description=http://www.farnell.com/datasheets/2167236.pdf?src-supplier=Element14, ComponentLink5URL=http://www.farnell.com/datasheets/2167236.pdf?src-supplier=Element14, ComponentLink6Description=http://www.farnell.com/datasheets/1489800.pdf?src-supplier=Element14, ComponentLink6URL=http://www.farnell.com/datasheets/1489800.pdf?src-supplier=Element14, Composition=Ceramic, Depth=0.5mm, Halogen Free="Halogen Free", Height=0.5mm, Lead Free="Lead Free", Length=1mm, Manufacturer Part Number=CC0402KRX7R7BB104, Mount="Surface Mount", Number of Pins=2, Packaging="Tape and Reel", Pricing 1="1=0.1, 10=0.034, 100=0.015, 500=0.0107, 1000=0.00841, 2500=0.00764, 5000=0.00703 (USD)", Radiation Hardening=No, REACH SVHC="No SVHC", Stock 1=16982736, Supplier 1=Digi-Key, Termination=SMD/SMT, Thickness=0.022inch, Voltage Rating=16V, Voltage Rating (DC)=16V, Width=0.02inch
C9 C10: library part GJM0336C1E200JB01D, "CAP CER 20PF 25V C0H 0201", Case/Package=0201, Case Code (Metric)=0603, Manufacturer=Murata, Max Operating Temperature=125°C, Min Operating Temperature=-55°C, Supplier Part Number 1=490-13313-1-ND, Tolerance=5%, Voltage Rating=25V, Capacitance=20pF, Case Code (Imperial)=0201, ComponentLink1Description=http://www.mouser.com/ds/2/281/c02e-2905.pdf?src-supplier=Mouser, ComponentLink1URL=http://www.mouser.com/ds/2/281/c02e-2905.pdf?src-supplier=Mouser, ComponentLink2Description=http://search.murata.co.jp/Ceramy/image/img/A01X/partnumbering_e_01.pdf?src-supplier=Digi-Key, ComponentLink2URL=http://search.murata.co.jp/Ceramy/image/img/A01X/partnumbering_e_01.pdf?src-supplier=Digi-Key, Lead Free="Lead Free", Length=0.024inch, Manufacturer Part Number=GJM0336C1E200JB01D, Mount="Surface Mount", Packaging="Tape and Reel", Pricing 1="1=0.1, 10=0.074, 100=0.0329, 500=0.02348, 1000=0.01845, 2500=0.01678, 5000=0.01543 (USD)", Stock 1=13650, Supplier 1=Digi-Key, Termination=SMD/SMT, Thickness=0.013inch, Voltage Rating (DC)=25V, Width=0.012inch
C15: library part CL10A475KA8NQNC, "CAP CER 4.7UF 25V X5R 0603", Case/Package=0603, Case Code (Metric)=1608, Dielectric=X5R, Manufacturer=Samsung, Max Operating Temperature=85°C, Min Operating Temperature=-55°C, Package Quantity=1, Supplier Part Number 1=1276-1900-1-ND, Tolerance=10%, Voltage Rating=25V, Capacitance=4.7uF, Case Code (Imperial)=0603, ComponentLink1Description=http://www.samsungsem.com/kr/support/product-search/mlcc/CL10A475KA8NQNC.jsp?src-supplier=Digi-Key, ComponentLink1URL=http://www.samsungsem.com/kr/support/product-search/mlcc/CL10A475KA8NQNC.jsp?src-supplier=Digi-Key, Contact Plating=Tin, Depth=0.8mm, Lead Free="Lead Free", Length=1.6mm, Manufacturer Part Number=CL10A475KA8NQNC, Mount="Surface Mount", Packaging="Tape and Reel", Pricing 1="1=0.37, 10=0.255, 100=0.1528, 500=0.11456, 1000=0.09675 (USD)", Stock 1=2252340, Supplier 1=Digi-Key, Termination=Wraparound, Thickness=0.035inch, Width=0.031inch
C16: library part GRM155R61E105KA12D, "CAP CER 1UF 25V X5R 0402", Case/Package=0402, Case Code (Metric)=1005, Dielectric=X5R, Manufacturer=Murata, Max Operating Temperature=85°C, Min Operating Temperature=-55°C, Package Quantity=10000, Supplier Part Number 1=490-10017-1-ND, Tolerance=10%, Voltage=25V, Capacitance=1uF, Case Code (Imperial)=0402, ComponentLink1Description=http://www.farnell.com/datasheets/2048341.pdf?src-supplier=Element14, ComponentLink1URL=http://www.farnell.com/datasheets/2048341.pdf?src-supplier=Element14, Depth=0.5mm, Height=0.5mm, Lead Free="Lead Free", Length=1mm, Manufacturer Part Number=GRM155R61E105KA12D, Material=Ceramic, Mount="Surface Mount", Packaging="Tape and Reel", Pricing 1="1=0.11, 10=0.077, 100=0.0363, 500=0.02546, 1000=0.02108, 2500=0.01962, 5000=0.01795 (USD)", REACH SVHC="No SVHC", Stock 1=1194305, Supplier 1=Digi-Key, Termination=SMD/SMT, Thickness=0.022inch, Voltage Rating=25V, Voltage Rating (DC)=25V, Weight=0.000212oz, Width=0.5mm
C19 C21: library part CL05A106MP8NUB8, "CAP CER 10UF 10V X5R 0402", Case/Package=0402, Case Code (Metric)=1005, Manufacturer=Samsung, Max Operating Temperature=85°C, Min Operating Temperature=-55°C, Supplier Part Number 1=1276-6830-1-ND, Tolerance=20%, Voltage Rating=10V, Capacitance=10uF, Case Code (Imperial)=0402, ComponentLink1Description=http://www.samsungsem.com/kr/support/product-search/mlcc/CL05A106MP8NUB8.jsp?src-supplier=Digi-Key, ComponentLink1URL=http://www.samsungsem.com/kr/support/product-search/mlcc/CL05A106MP8NUB8.jsp?src-supplier=Digi-Key, Length=0.039inch, Manufacturer Part Number=CL05A106MP8NUB8, Mount="Surface Mount", Packaging="Tape and Reel", Pricing 1="1=0.4, 10=0.278, 50=0.1948, 100=0.167, 500=0.12528, 1000=0.1058, 2500=0.10023 (USD)", Stock 1=1792112, Supplier 1=Digi-Key, Thickness=0.035inch, Width=0.02inch
C23 C24: library part GCM1555C1H470JA16D, "CAP CER 47PF 50V C0G/NP0 0402", Case/Package=0402, Case Code (Metric)=1005, Manufacturer=Murata, Max Operating Temperature=125°C, Min Operating Temperature=-55°C, Ratings=AEC-Q200, Supplier Part Number 1=490-10670-1-ND, Tolerance=5%, Voltage Rating=50V, Capacitance=47pF, Case Code (Imperial)=0402, ComponentLink1Description=https://www.murata.com/~/media/webrenewal/support/library/catalog/products/capacitor/mlcc/c03e.ashx?la=en-us&src-supplier=Digi-Key, ComponentLink1URL=https://www.murata.com/~/media/webrenewal/support/library/catalog/products/capacitor/mlcc/c03e.ashx?la=en-us&src-supplier=Digi-Key, ComponentLink2Description=http://www.mouser.com/ds/2/281/c03e-806517.pdf?src-supplier=Mouser, ComponentLink2URL=http://www.mouser.com/ds/2/281/c03e-806517.pdf?src-supplier=Mouser, ComponentLink3Description=http://psearch.en.murata.com/capacitor/product/GCM1555C1H470JA16%23.pdf?src-supplier=Avnet, ComponentLink3URL=http://psearch.en.murata.com/capacitor/product/GCM1555C1H470JA16%23.pdf?src-supplier=Avnet, Lead Free="Lead Free", Length=0.039inch, Manufacturer Part Number=GCM1555C1H470JA16D, Mount="Surface Mount", Packaging="Cut Tape", Pricing 1="1=0.1, 10=0.059, 50=0.0324, 100=0.0265, 500=0.01892, 1000=0.01487, 2500=0.01352, 5000=0.01244 (USD)", Stock 1=692165, Supplier 1=Digi-Key, Thickness=0.022inch, Width=0.02inch
D1: "DIODE SCHOTTKY 20V 1A SOD123FL", Average Rectified Current=1A, Forward Voltage=340mV, Manufacturer="ON Semiconductor", Max Forward Surge Current (Ifsm)=45A, Max Operating Temperature=125°C, Max Repetitive Reverse Voltage (Vrrm)=20V, Max Reverse Leakage Current=600uA, Min Operating Temperature=-65°C, Package Quantity=10000, Supplier Part Number 1=MBR120VLSFT3GOSCT-ND, ComponentLink1Description=http://www.mouser.com/ds/2/308/MBR120VLSFT1-D-107081.pdf?src-supplier=Mouser, ComponentLink1URL=http://www.mouser.com/ds/2/308/MBR120VLSFT1-D-107081.pdf?src-supplier=Mouser, ComponentLink2Description=http://www.onsemi.com/pub/Collateral/MBR120VLSFT1-D.PDF?src-supplier=Digi-Key, ComponentLink2URL=http://www.onsemi.com/pub/Collateral/MBR120VLSFT1-D.PDF?src-supplier=Digi-Key, ComponentLink3Description=http://www.onsemi.cn/pub_link/Collateral/MBR120VLSFT1-D.PDF?src-supplier=Avnet, ComponentLink3URL=http://www.onsemi.cn/pub_link/Collateral/MBR120VLSFT1-D.PDF?src-supplier=Avnet, Current Rating=1A, Element Configuration=Single, Forward Current=1A, Halogen Free="Halogen Free", Lead Free="Lead Free", Manufacturer Part Number=MBR120VLSFT3G, Max Reverse Voltage (DC)=20V, Max Surge Current=45A, Number of Pins=2, Output Current=1A, Packaging="Tape and Reel", Peak Non-Repetitive Surge Current=45A, Peak Reverse Current=600uA, Polarity=Standard, Pricing 1="1=0.42, 10=0.338, 100=0.2298, 500=0.17234, 1000=0.12926 (USD)", Radiation Hardening=No, REACH SVHC="No SVHC", Stock 1=130499, Supplier 1=Digi-Key, Voltage Rating (DC)=20V
LED1: "LED GREEN CLEAR SMD 0603", Case/Package=0603, Case Code (Metric)=1608, Color=Green, Forward Current=30mA, Forward Voltage=2V, Lens Color=Colorless, Manufacturer="Vishay Lite-On", Max Operating Temperature=85°C, Max Power Dissipation=75mW, Min Operating Temperature=-55°C, Package Quantity=1, Reverse Voltage=5V, Supplier Part Number 1=160-1446-1-ND, Test Current=20mA, Case Code (Imperial)=0603, ComponentLink1Description=http://optoelectronics.liteon.com/upload/download/DS22-2000-228/LTST-C191KGKT.PDF?src-supplier=Digi-Key, ComponentLink1URL=http://optoelectronics.liteon.com/upload/download/DS22-2000-228/LTST-C191KGKT.PDF?src-supplier=Digi-Key, Depth=0.8mm, Dominant Wavelength=571nm, Height=0.55mm, Illumination Color=Green, Lead Free="Lead Free", Length=1.6mm, Lens Style=Rectangular,Colorless, Lens Transparency=Clear, Luminous Intensity=35mcd, Manufacturer Part Number=LTST-C191KGKT, Mount="Surface Mount", Number of Elements=1, Number of LEDs=1, Number of Pins=2, Packaging="Tape and Reel", Power Dissipation=75mW, Power Rating=75mW, Pricing 1="1=0.26, 10=0.192, 100=0.0909, 500=0.0606, 1000=0.04747, 2500=0.04646 (USD)", Radiation Hardening=No, Stock 1=134396, Supplier 1=Digi-Key, Viewing Angle=130°, Wavelength=574nm, Width=0.8mm
LED2 LED3: library part APT1608QBC/D, "LED BLUE CLEAR CHIP SMD", Case/Package=0603, Case Code (Metric)=1608, Forward Current=20mA, Forward Voltage=3.3V, Lens Color=Clear,Colorless, Manufacturer=Kingbright, Max Operating Temperature=85°C, Min Operating Temperature=-40°C, Package Quantity=2000, Supplier Part Number 1=754-1434-1-ND, Case Code (Imperial)=0603, Color=Blue, ComponentLink1Description=http://www.kingbrightusa.com/images/catalog/SPEC/APT1608QBC-D.pdf?src-supplier=Digi-Key, ComponentLink1URL=http://www.kingbrightusa.com/images/catalog/SPEC/APT1608QBC-D.pdf?src-supplier=Digi-Key, ComponentLink2Description=http://www.mouser.com/ds/2/216/APT1608QBC-D-65281.pdf?src-supplier=Mouser, ComponentLink2URL=http://www.mouser.com/ds/2/216/APT1608QBC-D-65281.pdf?src-supplier=Mouser, Dominant Wavelength=465nm, Height=0.75mm, Illumination Color=Blue, Lead Free="Lead Free", Length=1.6mm, Lens Style=Clear,Flat, Lens Transparency=Clear, Luminous Intensity=100mcd, Manufacturer Part Number=APT1608QBC/D, Mount="Surface Mount", Number of LEDs=1, Number of Pins=2, Packaging="Tape and Reel", Pricing 1="1=0.49, 10=0.35, 25=0.286, 100=0.2288, 250=0.19304, 500=0.16446, 1000=0.1287 (USD)", Stock 1=106851, Supplier 1=Digi-Key, Test Current=20mA, Viewing Angle=120°, Width=0.8mm
P1 P2 P3 P4 P5 P6 P7 P8 P9 P10: library part "12MM Button", "CONN HEADER VERT 4POS 2.54MM", Color=Black, Manufacturer="Wurth Electronics", Supplier Part Number 1=732-5317-ND, ComponentLink1Description=http://www.farnell.com/cad/1737268.pdf?src-supplier=Element14, ComponentLink1URL=http://www.farnell.com/cad/1737268.pdf?src-supplier=Element14, ComponentLink2Description=https://katalog.we-online.de/em/datasheet/6130xx11121.pdf?src-supplier=Digi-Key, ComponentLink2URL=https://katalog.we-online.de/em/datasheet/6130xx11121.pdf?src-supplier=Digi-Key, Connector Type="Male Pin", Contact Material=Copper, Contact Mating Length=0.236inch, Contact Plating=Gold, Gender=Male, Lead Free="Lead Free", Manufacturer Part Number=61300411121, Mount="Through Hole", Number of Contacts=4, Number of Positions=4, Number of Rows=1, Packaging=Bulk, Pitch=0.1inch, Pricing 1="1=0.18, 10=0.153, 25=0.1272, 50=0.106, 100=0.096, 1000=0.088 (USD)", REACH SVHC=Unknown, Stock 1=20544, Supplier 1=Digi-Key, Termination=Solder
P15: "Wire connecting Pads"
Q1: "MOSFET P-CHAN 24V SOT23"
Q2 Q3 Q4 Q5 Q6 Q7 Q8 Q9 Q10 Q11: "NPN 50mA 15V 225mW SOT-23(SOT-23-3) Transistors (NPN/PNP) RoHS", Case/Package=SOT-23-3, Collector Base Voltage (VCBO)=30V, Collector Emitter Breakdown Voltage=15V, Collector Emitter Saturation Voltage=400mV, Current Rating=50mA, Emitter Base Voltage (VEBO)=3V, Frequency=600MHz, Manufacturer="ON Semiconductor", Max Operating Temperature=150°C, Max Power Dissipation=225mW, Min Operating Temperature=-55°C, Package Quantity=3000, Power Dissipation=300mW, Supplier Part Number 1=MMBT918LT1GOSCT-ND, Collector Emitter Voltage (VCEO)=15V, ComponentLink1Description=http://www.onsemi.com/pub/Collateral/MMBT918LT1-D.PDF?src-supplier=Avnet, ComponentLink1URL=http://www.onsemi.com/pub/Collateral/MMBT918LT1-D.PDF?src-supplier=Avnet, ComponentLink2Description=http://www.mouser.com/ds/2/308/MMBT918LT1-D-111406.pdf?src-supplier=Mouser, ComponentLink2URL=http://www.mouser.com/ds/2/308/MMBT918LT1-D-111406.pdf?src-supplier=Mouser, ComponentLink3Description=https://www.verical.com/server-webapp/html/getDatasheet?partID=70260&src-supplier=Verical, ComponentLink3URL=https://www.verical.com/server-webapp/html/getDatasheet?partID=70260&src-supplier=Verical, ComponentLink4Description=http://www.onsemi.com/pub/Collateral/MMBT918LT1-D.PDF?src-supplier=Future+Electronics, ComponentLink4URL=http://www.onsemi.com/pub/Collateral/MMBT918LT1-D.PDF?src-supplier=Future+Electronics, ComponentLink5Description=http://www.onsemi.com/pub/Collateral/MMBT918LT1-D.PDF?src-supplier=Digi-Key, ComponentLink5URL=http://www.onsemi.com/pub/Collateral/MMBT918LT1-D.PDF?src-supplier=Digi-Key, ComponentLink6Description=http://www.onsemi.com/pub/Collateral/MMBT918LT1-D.PDF?src-supplier=Avnet+Europe, ComponentLink6URL=http://www.onsemi.com/pub/Collateral/MMBT918LT1-D.PDF?src-supplier=Avnet+Europe, ComponentLink7Description=http://uk.rs-online.com/webdocs/1276/0900766b81276ae8.pdf?src-supplier=RSComponents, ComponentLink7URL=http://uk.rs-online.com/webdocs/1276/0900766b81276ae8.pdf?src-supplier=RSComponents, Contact Plating=Tin,Matte, Element Configuration=Single, Gain=11dB, Gain Bandwidth Product=600MHz, Height=1.01mm, hFE Min=20, Lead Free="Lead Free", Length=3.04mm, Manufacturer Part Number=MMBT918LT1G, Max Breakdown Voltage=15V, Max Collector Current=50mA, Max Frequency=600MHz, Number of Elements=1, Number of Pins=3, Packaging="Tape and Reel", Polarity=NPN, Pricing 1="1=0.28, 10=0.229, 25=0.1916, 100=0.1214, 250=0.09372, 500=0.07988, 1000=0.05432 (USD)", Radiation Hardening=No, REACH SVHC="No SVHC", Stock 1=8100, Supplier 1=Digi-Key, Transition Frequency=600MHz, Voltage Rating (DC)=15V, Width=1.4mm
R1: library part RT0603BRD07100KL, "RES SMD 100K OHM 0.1% 1/10W 0603", Case/Package=0603, Case Code (Metric)=1608, Manufacturer=Yageo, Max Operating Temperature=125°C, Max Power Dissipation=100mW, Min Operating Temperature=-55°C, Package Quantity=5000, Resistance=100kR, Supplier Part Number 1=YAG1235CT-ND, Temperature Coefficient=25ppm/°C, Tolerance=0.1%, Voltage Rating=75V, Case Code (Imperial)=0603, ComponentLink1Description=http://documents.rs-components.com/techlib://itc_doclist_GB.htm?stockno=6174810&src-supplier=RSComponents, ComponentLink1URL=http://documents.rs-components.com/techlib://itc_doclist_GB.htm?stockno=6174810&src-supplier=RSComponents, Composition="Thin Film", Depth=0.8mm, Features="Moisture Resistant", Height=0.022inch, Lead Free="Lead Free", Length=1.6mm, Manufacturer Part Number=RT0603BRD07100KL, Military Standard=Not, Mount="Surface Mount", Number of Terminations=2, Packaging="Tape and Reel", Power Rating=100mW, Pricing 1="1=0.39, 10=0.332, 100=0.1298, 1000=0.05435, 2500=0.04982 (USD)", Stock 1=53395, Supplier 1=Digi-Key, Termination=SMD/SMT, Voltage Rating (DC)=75V, Width=0.031inch, Working Voltage=75V
R2 R4 R11 R13 R15 R17 R19 R21 R23 R25 R27 R29 R53 R54 R55 R56 R57 R58 R59 R60 R61 R62 R63: library part RK73B1ETTP103J, "RES 10K OHM 5% 1/10W 0402", Case/Package=0402, Case Code (Metric)=1005, Manufacturer="KOA Speer", Max Operating Temperature=155°C, Min Operating Temperature=-55°C, Package Quantity=10000, Power Rating=63mW, Resistance=10kR, Supplier Part Number 1=2019-RK73B1ETTP103JCT-ND, Temperature Coefficient=200ppm/°C, Tolerance=5%, Voltage Rating=50V, Case Code (Imperial)=0402, ComponentLink1Description=https://www.verical.com/server-webapp/html/getDatasheet?partID=89073&src-supplier=Verical, ComponentLink1URL=https://www.verical.com/server-webapp/html/getDatasheet?partID=89073&src-supplier=Verical, Composition="Thick Film", Depth=0.5mm, Height=0.35mm, Lead Free="Lead Free", Length=1mm, Manufacturer Part Number=RK73B1ETTP103J, Military Standard=Not, Mount="Surface Mount", Packaging="Tape and Reel", Pricing 1="1=0.1, 10=0.016, 100=0.0065, 1000=0.00292, 2500=0.00253, 5000=0.00209 (USD)", Stock 1=2917894, Supplier 1=Digi-Key, Termination=SMD/SMT, Voltage Rating (DC)=50V, Width=0.5mm
R3: library part RC0603FR-07665RL, "RES SMD 665 OHM 1% 1/10W 0603", Case/Package=0603, Case Code (Metric)=1608, Manufacturer=Yageo, Max Operating Temperature=155°C, Max Power Dissipation=100mW, Min Operating Temperature=-55°C, Package Quantity=1, Resistor Type="Thick Film", Supplier Part Number 1=311-665HRCT-ND, Temperature Coefficient=100ppm/°C, Tolerance=1%, Voltage Rating=75V, Voltage Rating (DC)=50V, Case Code (Imperial)=0603, ComponentLink1Description=http://www.yageo.com/documents/recent/PYu-RC_Group_51_RoHS_L_9.pdf?src-supplier=Digi-Key, ComponentLink1URL=http://www.yageo.com/documents/recent/PYu-RC_Group_51_RoHS_L_9.pdf?src-supplier=Digi-Key, ComponentLink2Description=http://www.yageo.com/documents/recent/PYu-RC0603_51_RoHS_L_4.pdf?src-supplier=Avnet, ComponentLink2URL=http://www.yageo.com/documents/recent/PYu-RC0603_51_RoHS_L_4.pdf?src-supplier=Avnet, ComponentLink3Description=http://www.yageo.com/documents/recent/PYu-RC_Group_51_RoHS_L_10.pdf?src-supplier=Digi-Key, ComponentLink3URL=http://www.yageo.com/documents/recent/PYu-RC_Group_51_RoHS_L_10.pdf?src-supplier=Digi-Key, ComponentLink4Description=http://www.yageo.com/documents/recent/PYu-RC0603_51_RoHS_L_4.pdf?src-supplier=Avnet+Europe, ComponentLink4URL=http://www.yageo.com/documents/recent/PYu-RC0603_51_RoHS_L_4.pdf?src-supplier=Avnet+Europe, Contact Plating=Tin,Matte, Depth=0.8mm, Features="Moisture Resistant", Height=0.022inch, Lead Free="Lead Free", Length=1.6mm, Manufacturer Part Number=RC0603FR-07665RL, Military Standard=Not, Number of Terminations=2, Packaging="Tape and Reel", Power Rating=100mW, Pricing 1="1=0.1, 10=0.022, 100=0.009, 1000=0.00405, 2500=0.00352 (USD)", Resistance=665R, Stock 1=92350, Supplier 1=Digi-Key, Termination=SMD/SMT, Weight=7.1E-05oz, Width=0.8mm
R5 R6 R12 R14 R16 R18 R20 R22 R24 R26 R28 R30: library part RC0603FR-07330RL, "RES SMD 330 OHM 1% 1/10W 0603", Case/Package=0603, Case Code (Metric)=1608, Manufacturer=Yageo, Max Operating Temperature=155°C, Max Power Dissipation=100mW, Min Operating Temperature=-55°C, Package Quantity=1, Supplier Part Number 1=311-330HRCT-ND, Temperature Coefficient=100ppm/°C, Tolerance=1%, Voltage Rating=50V, Case Code (Imperial)=0603, ComponentLink1Description=http://www.yageo.com/documents/recent/PYu-RC_Group_51_RoHS_L_10.pdf?src-supplier=Digi-Key, ComponentLink1URL=http://www.yageo.com/documents/recent/PYu-RC_Group_51_RoHS_L_10.pdf?src-supplier=Digi-Key, ComponentLink2Description=http://www.farnell.com/datasheets/2167052.pdf?src-supplier=Mouser, ComponentLink2URL=http://www.farnell.com/datasheets/2167052.pdf?src-supplier=Mouser, ComponentLink3Description=http://www.farnell.com/datasheets/1868787.pdf?src-supplier=Element14, ComponentLink3URL=http://www.farnell.com/datasheets/1868787.pdf?src-supplier=Element14, ComponentLink4Description=http://www.farnell.com/datasheets/443971.pdf?src-supplier=Element14, ComponentLink4URL=http://www.farnell.com/datasheets/443971.pdf?src-supplier=Element14, ComponentLink5Description=http://www.farnell.com/datasheets/1686128.pdf?src-supplier=Element14, ComponentLink5URL=http://www.farnell.com/datasheets/1686128.pdf?src-supplier=Element14, ComponentLink6Description=http://documents.rs-components.com/techlib://itc_doclist_GB.htm?stockno=5046499&src-supplier=RSComponents, ComponentLink6URL=http://documents.rs-components.com/techlib://itc_doclist_GB.htm?stockno=5046499&src-supplier=RSComponents, Composition="Thick Film", Depth=0.8mm, Features="Moisture Resistant", Height=0.45mm, Lead Free="Lead Free", Length=1.6mm, Manufacturer Part Number=RC0603FR-07330RL, Number of Pins=2, Number of Terminations=2, Packaging="Tape and Reel", Power Rating=100mW, Pricing 1="1=0.1, 10=0.024, 100=0.0097, 1000=0.00437, 2500=0.00379 (USD)", REACH SVHC="No SVHC", Resistance=330R, Stock 1=9084897, Supplier 1=Digi-Key, Termination=SMD/SMT, Voltage Rating (DC)=50V, Width=0.8mm
R7 R8 R9: library part RC0402JR-0720KL, "RES SMD 20K OHM 1% 1/16W 0402", Case/Package=0402, Case Code (Metric)=1005, Manufacturer=Yageo, Max Operating Temperature=155°C, Max Power Dissipation=63mW, Min Operating Temperature=-55°C, Package Quantity=1, Power Rating=62.5mW, Resistance=20kR, Supplier Part Number 1=311-20KJRCT-ND, Temperature Coefficient=100ppm/°C, Tolerance=5%, Voltage Rating=50V, Case Code (Imperial)=0402, ComponentLink1Description=https://industrial.panasonic.com/cdbs/www-data/pdf/RDA0000/AOA0000C301.pdf?src-supplier=Future+Electronics, ComponentLink1URL=https://industrial.panasonic.com/cdbs/www-data/pdf/RDA0000/AOA0000C301.pdf?src-supplier=Future+Electronics, ComponentLink2Description=http://www.jameco.com/Jameco/Products/ProdDS/1986781.pdf?src-supplier=Jameco, ComponentLink2URL=http://www.jameco.com/Jameco/Products/ProdDS/1986781.pdf?src-supplier=Jameco, ComponentLink3Description=http://www.farnell.com/datasheets/2059623.pdf?src-supplier=Farnell, ComponentLink3URL=http://www.farnell.com/datasheets/2059623.pdf?src-supplier=Farnell, ComponentLink4Description=http://industrial.panasonic.com/www-data/pdf/AOA0000/AOA0000CE1.pdf?src-supplier=Avnet, ComponentLink4URL=http://industrial.panasonic.com/www-data/pdf/AOA0000/AOA0000CE1.pdf?src-supplier=Avnet, ComponentLink5Description=http://www.alliedelec.com/m/d/51cd0790071e1666bdb9d00c57fcf960.pdf?src-supplier=Allied+Electronics, ComponentLink5URL=http://www.alliedelec.com/m/d/51cd0790071e1666bdb9d00c57fcf960.pdf?src-supplier=Allied+Electronics, ComponentLink6Description=http://industrial.panasonic.com/www-data/pdf/AOA0000/AOA0000CE1.pdf?src-supplier=Avnet+Europe, ComponentLink6URL=http://industrial.panasonic.com/www-data/pdf/AOA0000/AOA0000CE1.pdf?src-supplier=Avnet+Europe, ComponentLink7Description=http://www.farnell.com/datasheets/2059623.pdf?src-supplier=Element14, ComponentLink7URL=http://www.farnell.com/datasheets/2059623.pdf?src-supplier=Element14, ComponentLink8Description=http://industrial.panasonic.com/cdbs/www-data/pdf/RDA0000/AOA0000C301.pdf?src-supplier=Farnell, ComponentLink8URL=http://industrial.panasonic.com/cdbs/www-data/pdf/RDA0000/AOA0000C301.pdf?src-supplier=Farnell, ComponentLink9Description=http://industrial.panasonic.com/www-data/pdf/AOA0000/AOA0000CE1.pdf?src-supplier=Avnet+Asia, ComponentLink9URL=http://industrial.panasonic.com/www-data/pdf/AOA0000/AOA0000CE1.pdf?src-supplier=Avnet+Asia, ComponentLink10Description=http://www.yageo.com.tw/exep/pages/download/literatures/PYu-R_INT-thick_7.pdf?src-supplier=Digi-Key, ComponentLink10URL=http://www.yageo.com.tw/exep/pages/download/literatures/PYu-R_INT-thick_7.pdf?src-supplier=Digi-Key, ComponentLink11Description=http://www.yageo.com/NewPortal/yageodocoutput?fileName=/pdf/R-Chip/PYu-RC_51_RoHS_P_0.pdf&src-supplier=Digi-Key, ComponentLink11URL=http://www.yageo.com/NewPortal/yageodocoutput?fileName=/pdf/R-Chip/PYu-RC_51_RoHS_P_0.pdf&src-supplier=Digi-Key, ComponentLink12Description=http://www.yageo.com/documents/recent/PYu-RC0402_51_RoHS_L_6_r.pdf?src-supplier=Future+Electronics, ComponentLink12URL=http://www.yageo.com/documents/recent/PYu-RC0402_51_RoHS_L_6_r.pdf?src-supplier=Future+Electronics, ComponentLink13Description=http://www.mouser.com/ds/2/447/PYu-RC0402_51_RoHS_L_6_r-8721.pdf?src-supplier=Mouser, ComponentLink13URL=http://www.mouser.com/ds/2/447/PYu-RC0402_51_RoHS_L_6_r-8721.pdf?src-supplier=Mouser, ComponentLink14Description=http://www.yageo.com/documents/recent/PYu-RC0402_51_RoHS_L_6.pdf?src-supplier=Avnet+Europe, ComponentLink14URL=http://www.yageo.com/documents/recent/PYu-RC0402_51_RoHS_L_6.pdf?src-supplier=Avnet+Europe, ComponentLink15Description=http://www.yageo.com/documents/recent/PYu-RC_Group_51_RoHS_L_9.pdf?src-supplier=Digi-Key, ComponentLink15URL=http://www.yageo.com/documents/recent/PYu-RC_Group_51_RoHS_L_9.pdf?src-supplier=Digi-Key, ComponentLink16Description=http://www.farnell.com/datasheets/1018594.pdf?src-supplier=Element14, ComponentLink16URL=http://www.farnell.com/datasheets/1018594.pdf?src-supplier=Element14, Composition="Thick Film", Depth=0.5mm, Features="Moisture Resistant", Height=0.016inch, Lead Free="Lead Free", Length=0.039inch, Manufacturer Part Number=RC0402JR-0720KL, Military Standard=Not, Number of Pins=2, Number of Terminations=2, Packaging="Tape and Reel", Pricing 1="1=0.1, 10=0.013, 100=0.0053, 1000=0.0024, 2500=0.0021, 5000=0.0017 (USD)", REACH SVHC="No SVHC", Stock 1=4805429, Supplier 1=Digi-Key, Termination=SMD/SMT, Voltage Rating (DC)=50V, Width=0.02inch